# EAGLE board synth (EAGLE 9.6.2)

Size 50 x 40 mm. Coordinates in mm from the lower left corner, seen from the top.
Outline: 0,0 50,0 50,35 arc90 45,40 0,40 0,0
Copper layers used: 

## Footprints (pad centres in the part's own frame; a part is rotated, then mirrored left to right if it is on the bottom)
R0805 = smd 1 x 1.3: 1 -0.95,0; 2 0.95,0
FID1MM = smd 1 x 1: 1 0,0
HDR3 = drill 1 pad 1.7 square: 1 -2.54,0 | drill 1 pad 1.7: 2 0,0; 3 2.54,0
SOIC8 = smd 1.5 x 0.6: 1 -2.7,1.905; 2 -2.7,0.635; 3 -2.7,-0.635; 4 -2.7,-1.905; 5 2.7,-1.905; 6 2.7,-0.635; 7 2.7,0.635; 8 2.7,1.905

## Placement (x,y rotation side)
C1  100nF  [R0805]  20,10 90 top
FID1  [FID1MM]  5,5 0 top
J1  HDR  [HDR3]  12,30 270 top
R1  10k  [R0805]  10,10 0 top
R2  10k  [R0805]  40,10 180 bottom
U1  LM358  [SOIC8]  30,22 90 bottom

## Library data of the parts
C1 = synth; MPN: CC0805-100N
FID1 = synth
J1 = synth; MPN: HDR-1X3
R1 R2 = synth; MPN: RC0805-10K
U1 = synth; MPN: LM358

## Text on the board
layer 21: synth & test